# Altium PCB 2026.08.07.HMS.PD.BHHH.PcbDoc (part 1 of 2)
Units mm, origin at the board's own origin, x right, y up, seen from the top; angles counter-clockwise.
Board outline 110 x 110 mm, 2 copper layers (Top Layer, Bottom Layer); 168 components, 117 nets, 606 pads, 1355 vias.
Unrouted connection lines stored in the file: 4.
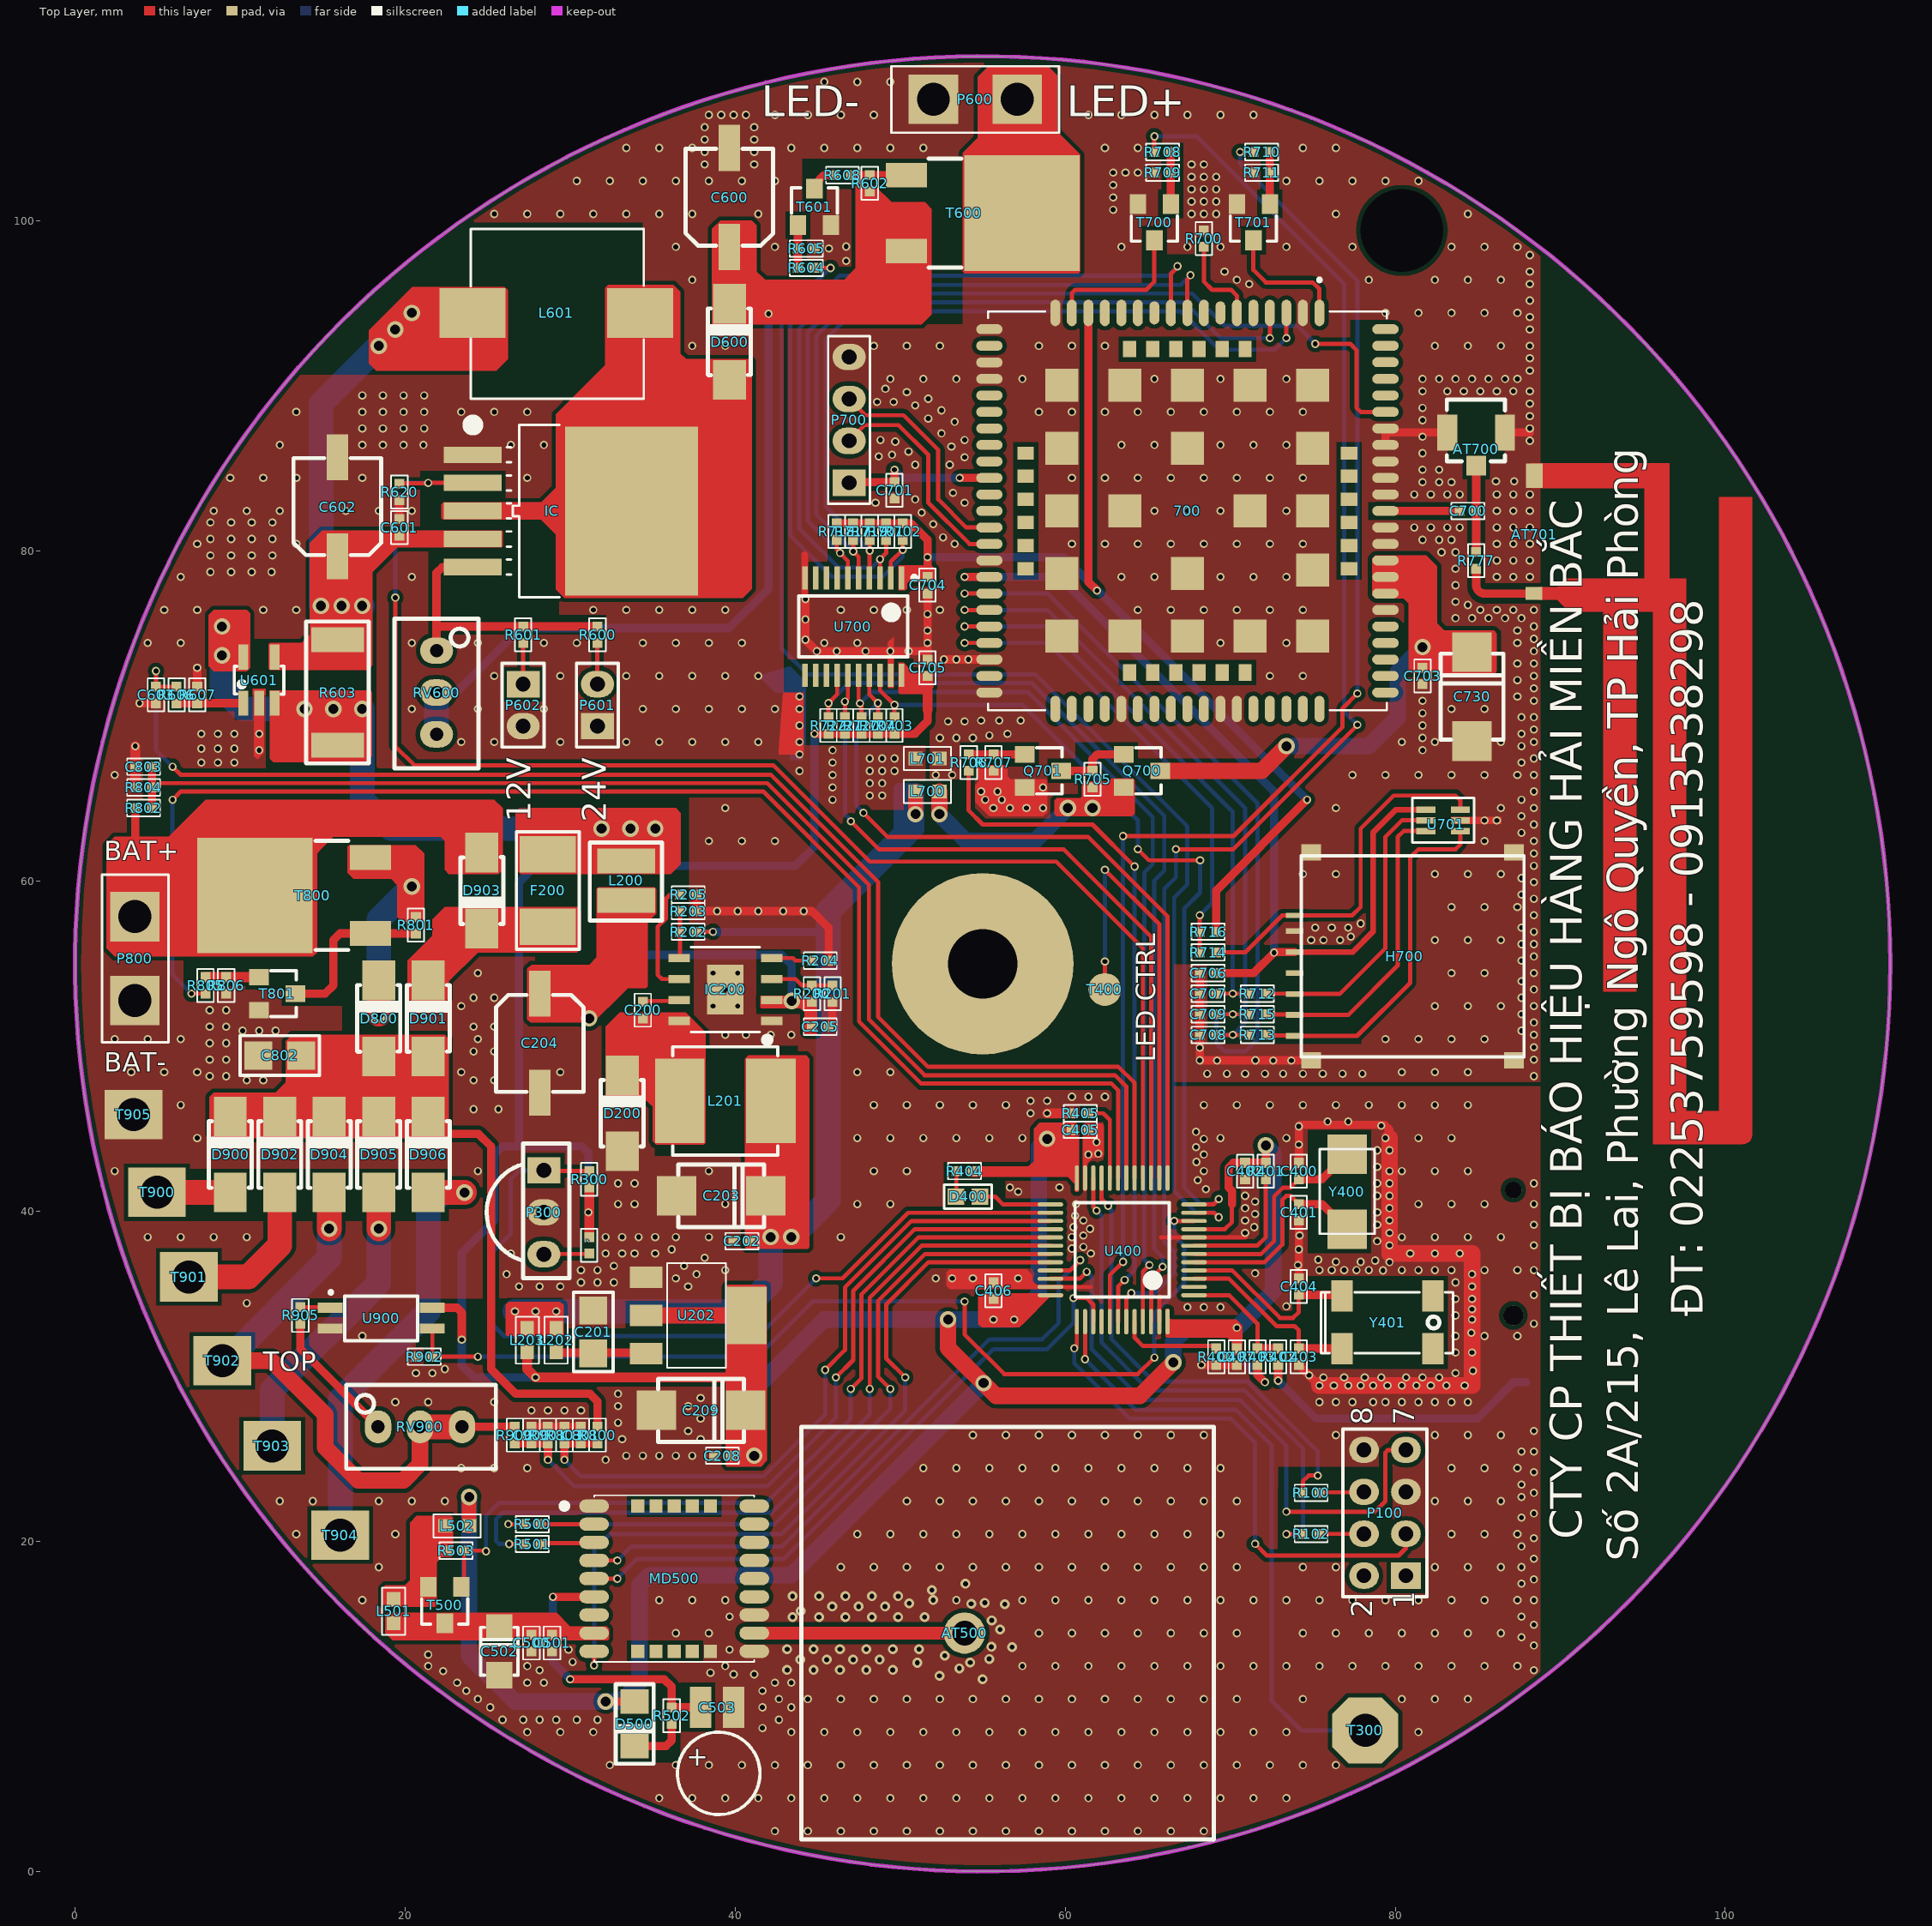
[diagram p0: Top Layer view]
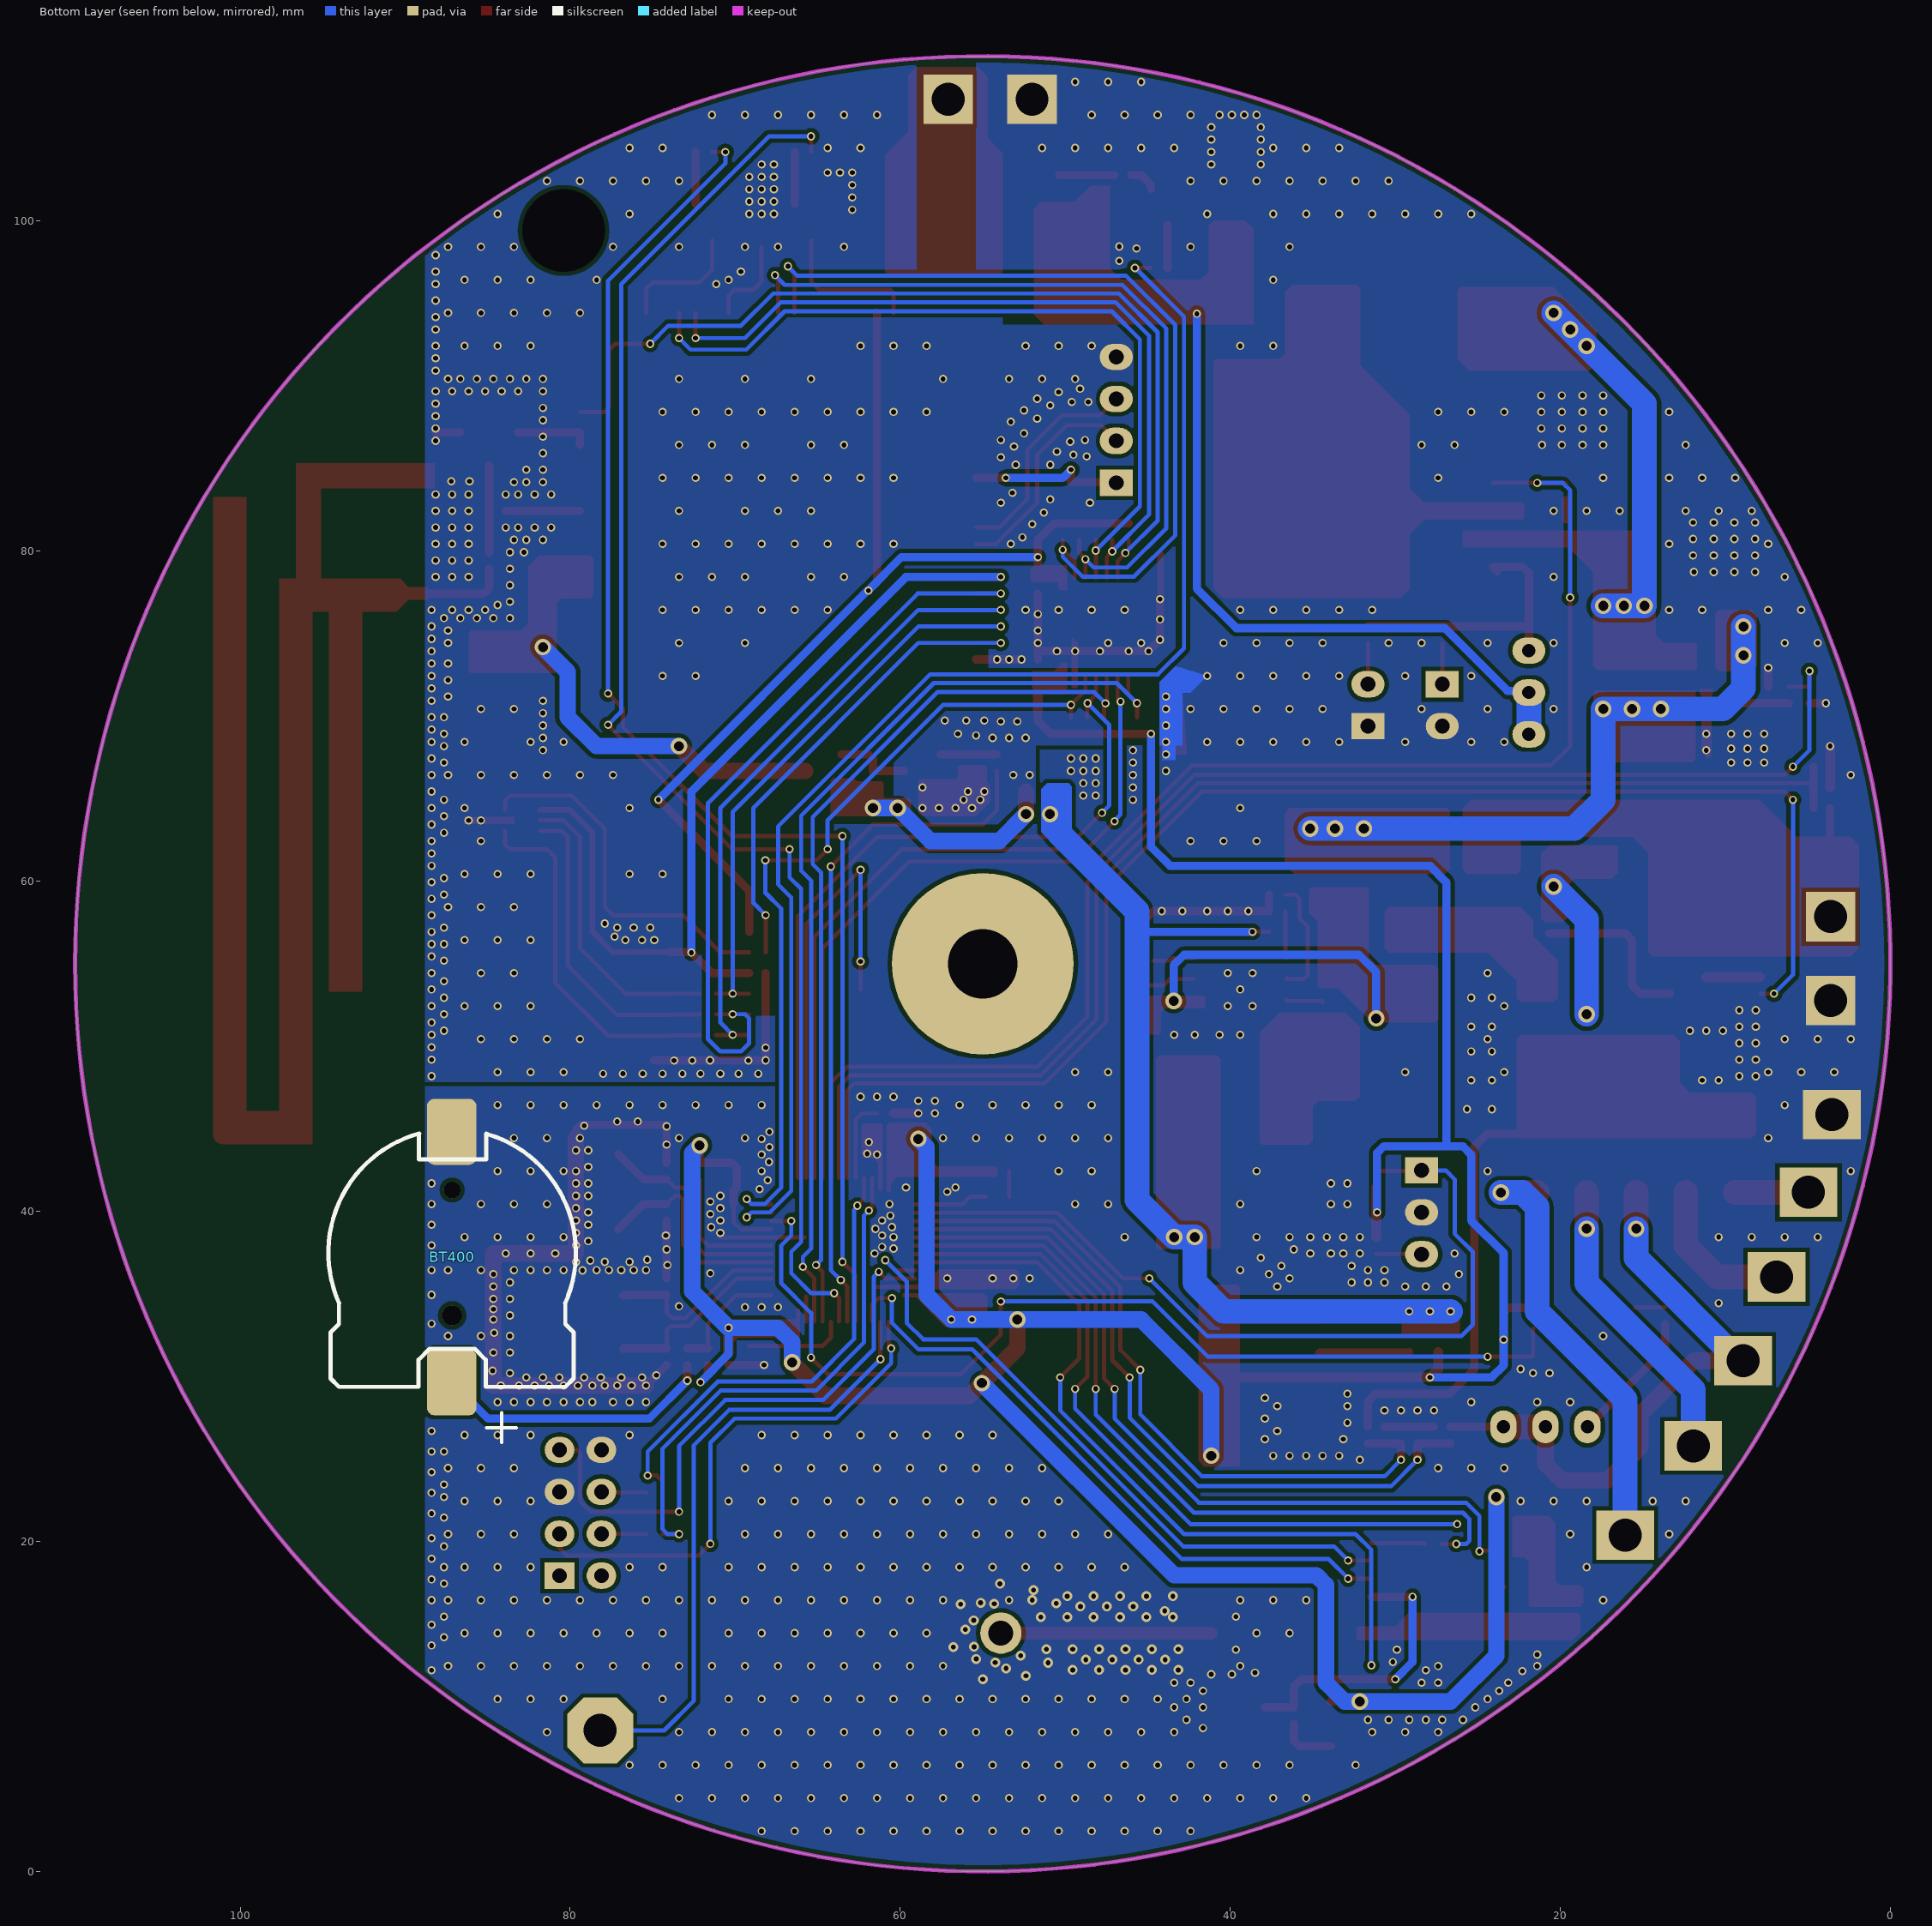
[diagram p1: Bottom Layer view, seen from below]
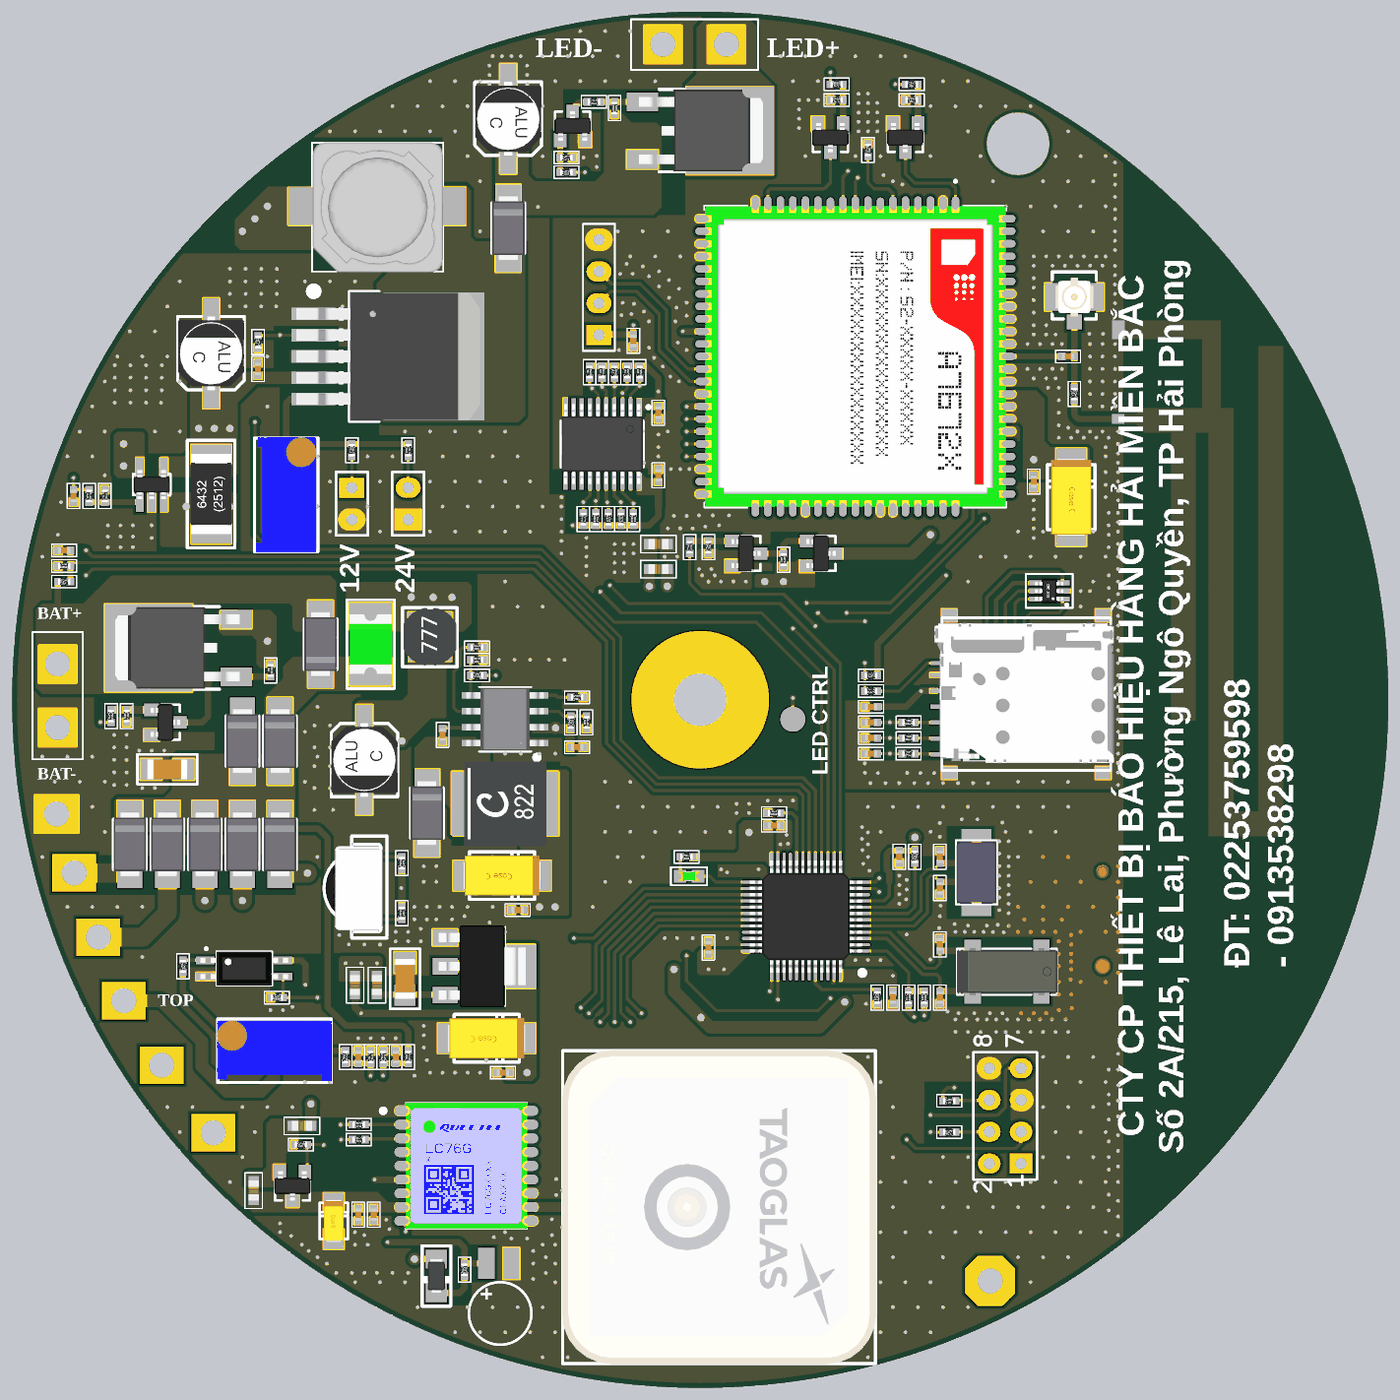
[diagram p3: 3D render of the assembled board from above, using the file's embedded part models]

## Layer stack, top to bottom
Top Solder: solder mask 0.0102, Solder Resist, Dk 3.5
Top Layer: signal copper 0.0356
Dielectric 1: dielectric 0.32, FR-4, Dk 4.8
Bottom Layer: signal copper 0.0356
Bottom Solder: solder mask 0.0102, Solder Resist, Dk 3.5

## Board outline
0,55 ccw(c55,55) 55,0 ccw(c55,55) 110,55 ccw(c55,55) 55,110 ccw(c55,55)

## Design rules (kind name [scope] priority, off if disabled: settings)
Clearance [not InComponent('U400','U701')] p1: gap=0.254
ComponentClearance [All] p1: gap=0 collisioncheckmode=3 verticalgap=0 showdistances=FALSE
HoleSize [All] p1: absolutevalues=TRUE maxlimit=25 minlimit=0.025 maxpercent=80.000 minpercent=20.000
PlaneConnect [All] p1: planeconnectstyle=Direct reliefexpansion=0.508 reliefentries=4 reliefconductorwidth=0.254 reliefairgap=0.254
PolygonConnect [All] p1: connectstyle=Direct reliefconductorwidth=0.254 reliefentries=4 polygonreliefangle="90 Angle" airgapwidth=0.254
RoutingVias [All] p1: holewidth=0.4 width=8 viastyle="Through Hole" minholewidth=0.3 minwidth=0.5 maxholewidth=0.6 maxwidth=1
SilkToSilkClearance [All] p1: silktosilkclearance=0
SilkToSolderMaskClearance [IsPad] p1: minsilkscreentomaskgap=0 clearancetoexposedcopper=TRUE
SolderMaskExpansion [All] p1: expansion=0.102
Width [All] p1: maxlimit=1.5 minlimit=0.254 preferedwidth=0.5
24 further rules are at their usual default settings.

## Classes and differential pairs
component class HMS.VS1838B: ` P300 R300 T300
component class HMS_Solar: C900 D900 D901 D902 D903 D904 D905 D906 R900 R901 R902 R905 RV900 T900 T901 T902 T903 T904 T905 U900
component class HMS_NiMHCharge: C801 C802 C803 D800 P800 R800 R801 R802 R803 R804 R805 R806 T800 T801
component class U_HMS.SIM.A7677S: 700 AT700 AT701 C700 C701 C703 C704 C705 C706 C707 C708 C709 C730 g H700 L700 L701 P700 Q700 Q701 R700 R701 R702 R703 R704 R705 R706 R707 R708 R709 R710 R711 R712 R713 R714 R715 R716 R717 R718 R719 R720 R721 R722 R777 T700 T701 U700 U701
component class HMS.STM32L151CBT6: BT400 C400 C401 C402 C403 C404 C405 C406 C407 D400 R400 R401 R402 R403 R404 R405 T400 U400 Y400 Y401
component class HMS.Power: C200 C201 C202 C203 C204 C205 C208 C209 D200 F200 IC200 L200 L201 L202 L203 R200 R201 R202 R203 R204 R205 U202
component class HMS.LedCtrl: C600 C601 C602 C603 D600 IC L601 P600 P601 P602 R600 R601 R602 R603 R604 R605 R606 R607 R608 R620 RV600 T600 T601 U601
component class U_HMS.LC76G: AT500 C500 C501 C502 C503 D500 L501 L502 MD500 R500 R501 R502 R503 T500
component class HMS.Bootloader: P100 R100 R102
net class 50Ohm: NetAT500_1

## Components (designator, comment, footprint, x,y, rotation, side; value= is the part's Value field where it differs from the comment)
700 "A767S2 S2-10AG4-Z31JP" SIM_A7672 75.404,94.443 r270 top
` "100R" RES_0402(1005) 31.154,37.943 r270 top
AT500 "GPS Antenna" "ANT GPS Passive" 53.904,14.443 r180 top
AT700 "NC" "IPEX SMD" 84.904,85.193 r270 top
AT701 "LTE Antenna" "Antenna LTE/4G PCB" 88.404,77.443 r0 top
BT400 "NC" "DE PIN NHO 3V3" 87.154,37.493 r270 bottom locked
C200 "104/50V" CAP_CERAMIC_0402(1005) 34.404,52.193 r90 top
C201 "106/50V" CAP_CERAMIC_1206(3216-18) 31.404,32.693 r270 top
C202 "104/50V" CAP_CERAMIC_0402(1005) 40.404,38.193 r0 top
C203 "107/10V" CAP_TANTAL_2312(6032-28) 39.154,40.943 r180 top
C204 "10uF/50V" CAP_ALUM_SMD_5054_TYPE_C 28.154,50.193 r90 top
C205 "104/50V" CAP_CERAMIC_0402(1005) 45.154,51.193 r180 top
C208 "104/50V" CAP_CERAMIC_0402(1005) 39.229,25.193 r0 top
C209 "107/10V" CAP_TANTAL_2312(6032-28) 37.929,27.943 r180 top
C400 "20pF/50V" CAP_CERAMIC_0402(1005) 74.154,42.443 r270 top
C401 "20pF/50V" CAP_CERAMIC_0402(1005) 74.154,39.943 r90 top
C402 "104/50V" CAP_CERAMIC_0402(1005) 70.904,42.443 r90 top
C403 "10pF/50V" CAP_CERAMIC_0402(1005) 74.154,31.193 r90 top
C404 "10pF/50V" CAP_CERAMIC_0402(1005) 74.154,35.443 r270 top
C405 "104/50V" CAP_CERAMIC_0402(1005) 60.904,44.943 r180 top
C406 "104/50V" CAP_CERAMIC_0402(1005) 55.654,35.193 r270 top
C407 "104/50V" CAP_CERAMIC_0402(1005) 70.404,31.193 r90 top
C500 "104/50V" CAP_CERAMIC_0402(1005) 27.654,13.843 r90 top
C501 "10pF/50V" CAP_CERAMIC_0402(1005) 28.904,13.843 r90 top
C502 "107/10V" CAP_TANTAL_1206(3216-18) 25.704,13.343 r270 top
C503 "NC" SPCAP0.22F 38.904,9.943 r180 top
C600 "10uF/50V" CAP_ALUM_SMD_5054_TYPE_C 39.654,101.443 r270 top
C601 "104/50V" CAP_CERAMIC_0402(1005) 19.654,81.443 r270 top
C602 "10uF/50V" CAP_ALUM_SMD_5054_TYPE_C 15.904,82.693 r270 top
C603 "104/50V" CAP_CERAMIC_0402(1005) 4.904,71.293 r90 top
C700 "100pF/50V" CAP_CERAMIC_0402(1005) 84.404,82.443 r180 top
C701 "104/50V" CAP_CERAMIC_0402(1005) 49.654,83.693 r270 top
C703 "104/50V" CAP_CERAMIC_0402(1005) 81.654,72.443 r90 top
C704 "104/50V" CAP_CERAMIC_0402(1005) 51.654,77.943 r90 top
C705 "104/50V" CAP_CERAMIC_0402(1005) 51.654,72.943 r270 top
C706 "104/50V" CAP_CERAMIC_0402(1005) 68.654,54.443 r0 top
C707 "20pF/50V" CAP_CERAMIC_0402(1005) 68.654,53.193 r0 top
C708 "20pF/50V" CAP_CERAMIC_0402(1005) 68.654,50.693 r0 top
C709 "20pF/50V" CAP_CERAMIC_0402(1005) 68.654,51.943 r0 top
C730 "107/10V" CAP_TANTAL_2312(6032-28) 84.654,71.193 r270 top
C801 "104/50V" CAP_CERAMIC_0402(1005) 30.654,26.443 r270 top
C802 "106/50V" CAP_CERAMIC_1206(3216-18) 12.404,49.443 r180 top
C803 "104/50V" CAP_CERAMIC_0402(1005) 4.154,66.943 r0 top
C900 "104/50V" CAP_CERAMIC_0402(1005) 27.654,26.443 r270 top
D200 "SS34" DO214AC_SMA_1808 33.154,45.943 r90 top
D400 "LED Red" LED_0603_GREEN 54.104,40.893 r0 top
D500 "1N4148W" DIODE_F03_1005 33.904,8.943 r270 top
D600 "SS54" DO214AC_SMA_1808 39.654,92.693 r90 top
D800 "SS34" DO214AC_SMA_1808 18.404,51.693 r90 top
D900 "SS34" DO214AC_SMA_1808 9.404,43.443 r90 top
D901 "SS34" DO214AC_SMA_1808 21.404,51.693 r90 top
D902 "SS34" DO214AC_SMA_1808 12.404,43.443 r90 top
D903 "SS34" DO214AC_SMA_1808 24.654,59.443 r270 top
D904 "SS34" DO214AC_SMA_1808 15.404,43.443 r90 top
D905 "SS34" DO214AC_SMA_1808 18.404,43.443 r90 top
D906 "SS34" DO214AC_SMA_1808 21.404,43.443 r90 top
F200 "1A/33V" MF-MSMF 28.654,59.443 r90 top
H700 "MUP-C7801-2" MUP-C7801 74.304,49.353 r90 top
IC "XL6019E1" TO-263-5 28.904,82.443 r270 top
IC200 "RY81020CP8" MK9019 39.404,53.443 r180 top
L200 "3.3uH" L2.1A_3.5_3.3 33.404,60.043 r180 top
L201 "10uH" L3A_7x7x3mm 39.404,46.693 r0 top
L202 "FBMJ1608HM230NT" Inductor_0603 29.154,32.193 r270 top
L203 "FBMJ1608HM230NT" Inductor_0603 27.404,32.193 r270 top
L501 "4A/23Ohm" Inductor_0603 19.304,15.766 r270 top
L502 "NC" Inductor_0603 23.154,20.943 r180 top
L601 "33uH" L3A_10x10x4mm 29.154,94.443 r0 top
L700 "FBMJ1608HM230NT" Inductor_0603 51.654,65.443 r0 top
L701 "FBMJ1608HM230NT" Inductor_0603 51.654,67.443 r0 top
MD500 "SIM65M-C" LC76G_GPS 31.454,22.143 r0 top
P100 "NC" HDR2X4 80.644,17.923 r90 top
P300 "VS1838B" IR_RECEIVER 28.404,39.943 r270 top
P600 "NC" H2_BIG 54.554,107.393 r180 top
P601 "24V" HDR1X2 31.654,70.673 r90 top
P602 "12V" HDR1X2 27.154,70.673 r270 top
P700 "NC" HDR1X4 46.904,87.963 r90 top
P800 "NC" H2_BIG 3.629,55.318 r270 top
Q700 "AO3415" SOT23-3 64.654,66.693 r270 top
Q701 "C1815" SOT23-3 58.654,66.693 r270 top
R100 "1K" RES_0402(1005) 74.904,22.943 r180 top
R102 "1K" RES_0402(1005) 74.904,20.443 r180 top
R200 "68K" RES_0402(1005) 44.654,53.193 r270 top
R201 "20K" RES_0402(1005) 45.904,53.193 r90 top
R202 "20K" RES_0402(1005) 37.154,56.943 r0 top
R203 "5.1K" RES_0402(1005) 37.154,58.193 r180 top
R204 "20K" RES_0402(1005) 45.154,55.193 r180 top
R205 "NC" RES_0402(1005) 37.154,59.193 r180 top
R300 "10K" RES_0402(1005) 31.154,41.943 r270 top
R400 "100K" RES_0402(1005) 69.154,31.193 r90 top
R401 "100K" RES_0402(1005) 72.154,42.443 r90 top
R402 "NC" RES_0402(1005) 72.904,31.193 r90 top
R403 "0R" RES_0402(1005) 71.654,31.193 r90 top
R404 "1K" RES_0402(1005) 53.904,42.443 r180 top
R405 "100K" RES_0402(1005) 60.904,45.943 r0 top
R500 "1K" RES_0402(1005) 27.704,21.043 r180 top
R501 "1K" RES_0402(1005) 27.704,19.843 r180 top
R502 "100R" RES_0402(1005) 36.154,9.443 r270 top
R503 "10K" RES_0402(1005) 23.079,19.443 r180 top
R600 "5.1K" RES_0402(1005) 31.654,74.943 r90 top
R601 "10K" RES_0402(1005) 27.154,74.943 r90 top
R602 "10K" RES_0402(1005) 48.154,102.293 r270 top
R603 "0.1R" RES_2512 15.904,71.443 r90 top
R604 "1K" RES_0402(1005) 44.304,97.168 r180 top
R605 "10K" RES_0402(1005) 44.304,98.343 r180 top
R606 "330R" RES_0402(1005) 6.154,71.293 r90 top
R607 "100K" RES_0402(1005) 7.404,71.293 r270 top
R608 "10K" RES_0402(1005) 46.504,102.793 r180 top
R620 "100K" RES_0402(1005) 19.654,83.593 r90 top
R700 "NC" RES_0402(1005) 68.404,98.943 r270 top
R701 "2K2" RES_0402(1005) 49.154,81.193 r90 top
R702 "2K2" RES_0402(1005) 50.154,81.193 r90 top
R703 "2K2" RES_0402(1005) 49.654,69.443 r270 top
R704 "2K2" RES_0402(1005) 48.654,69.443 r270 top
R705 "10K" RES_0402(1005) 61.654,66.193 r90 top
R706 "1K" RES_0402(1005) 54.154,67.193 r270 top
R707 "10K" RES_0402(1005) 55.654,67.193 r270 top
R708 "1K" RES_0402(1005) 65.904,104.193 r180 top
R709 "4.7K" RES_0402(1005) 65.904,102.943 r180 top
R710 "1K" RES_0402(1005) 71.904,104.193 r180 top
R711 "4.7K" RES_0402(1005) 71.904,102.943 r180 top
R712 "0R" RES_0402(1005) 71.654,53.193 r0 top
R713 "0R" RES_0402(1005) 71.654,50.693 r0 top
R714 "0R" RES_0402(1005) 68.654,55.693 r0 top
R715 "0R" RES_0402(1005) 71.654,51.943 r0 top
R716 "4.7K" RES_0402(1005) 68.654,56.943 r0 top
R717 "2K2" RES_0402(1005) 47.154,81.193 r90 top
R718 "2K2" RES_0402(1005) 46.154,81.193 r90 top
R719 "2K2" RES_0402(1005) 48.154,81.193 r90 top
R720 "2K2" RES_0402(1005) 47.654,69.443 r270 top
R721 "2K2" RES_0402(1005) 46.654,69.443 r270 top
R722 "2K2" RES_0402(1005) 45.654,69.443 r270 top
R777 "NC" RES_0402(1005) 84.904,79.443 r90 top
R800 "100K" RES_0402(1005) 31.654,26.443 r90 top
R801 "10K" RES_0402(1005) 20.654,57.343 r90 top
R802 "100K" RES_0402(1005) 4.154,64.443 r180 top
R803 "10K" RES_0402(1005) 29.654,26.443 r270 top
R804 "10K" RES_0402(1005) 4.154,65.693 r0 top
R805 "1K" RES_0402(1005) 7.904,53.693 r90 top
R806 "10K" RES_0402(1005) 9.154,53.693 r90 top
R900 "100K" RES_0402(1005) 26.654,26.443 r90 top
R901 "10K" RES_0402(1005) 28.654,26.443 r270 top
R902 "10K" RES_0402(1005) 21.154,31.193 r0 top
R905 "10K" RES_0402(1005) 13.654,33.693 r270 top
RV600 "204" RES_VAR_Type1 21.904,71.443 r270 top
RV900 "104" RES_VAR_Type1 20.904,26.943 r0 top
T300 "Test Point" TP 78.179,8.543 r0 top
T400 "Test Point" "Test Point SMD" 62.404,53.443 r90 top
T500 "AO3415" SOT23-3 22.404,16.143 r180 top
T600 "AOD409" TO252 55.904,100.493 r270 top
T601 "C1815" SOT23-3 44.804,100.868 r0 top
T700 "C1815" SOT23-3 65.404,99.943 r180 top
T701 "2SC1815" SOT23-3 71.404,99.943 r180 top
T800 "AOD409" TO252 12.372,59.143 r90 top
T801 "C1815" SOT23-3 12.254,53.193 r270 top
T900 "Test Point" TP_2 4.962,41.157 r180 top
T901 "Test Point" TP_2 6.892,36.026 r180 top
T902 "Test Point" TP_2 8.924,30.946 r180 top
T903 "Test Point" TP_2 11.947,25.79 r180 top
T904 "Test Point" TP_2 16.074,20.38 r180 top
T905 "Test Point" TP_2 3.554,45.868 r180 top
U202 "TLV1117LV33DCYR" LM1117-SOP 37.654,33.693 r270 top
U400 "STM32L151CBT6" LQFP48_L 63.454,37.668 r180 top locked
U601 "INA138NA/3K" SOT23-5 11.154,72.193 r0 top
U700 "TC7MPB9307FT(EL)" TSOP65P640X120-20N 47.154,75.443 r270 top
U701 "SMF05CT2G" SOT65P210X140-6N 82.904,63.693 r180 top
U900 "EL3H7(C)(TA)-G" "Opto small" 18.904,33.693 r0 top
Y400 "8Mhz" CRYSTAL_SMD_2PIN-5032 77.079,41.193 r90 top
Y401 "32.768KHz" ABS25-32768-6-T 79.529,33.268 r0 top

## Footprints (in the part's own frame and the unit in brackets; to place one, negate y for a bottom-side part, rotate by r counter-clockwise, add the part's x,y. Pads: shape width x height; smd on the part's side, far side on the other; paste and mask are expansions set on the pad)
ABS25-32768-6-T [mm] "CRYSTAL 32.768KHZ 6PF SMD"
  rect 1.3x1.9 smd: 1(-2.75,-1.6) 2(2.75,-1.6) 3(2.75,1.6) 4(-2.75,1.6)
  silkscreen extent -4.02,-1.85 3.98,1.83, body extent -4,-1.9 4,1.9, height 2.53
"ANT GPS Passive" [mm]
  round 2.5 hole 1.5: 1(0,0)
  silkscreen extent -15.1,-12.5 9.9,12.5, body extent -15.15,-12.55 9.95,12.55, height 4.73
"Antenna LTE/4G PCB" [mm]
  rect 1x0.77 smd paste+0 mask+0: 1(0,0)
  rect 1x1.5 smd paste+0 mask+0: 2(0.026,7.138)
  Top Layer region: 0.254,-0.38 1.397,-0.38 2.131,-1.114 4.216,-1.114 4.216,-24.126 6.215,-24.126 6.215,-1.114 7.216,-1.114 7.216,-33.362 12.67,-33.362 12.879,-33.32 13.056,-33.202 13.174,-33.025 13.216,-32.816 13.216,-32.816 13.216,5.843 11.214,5.843 11.214,-31.36 9.215,-31.36 9.215,0.888 8.217,0.888 8.217,7.885 -0.178,7.885 -0.178,6.387 6.713,6.387 6.713,0.888 1.902,0.888 1.4,0.385 0.257,0.385 0,0.128 0,-0.128
CAP_ALUM_SMD_5054_TYPE_C [mm]
  rect 2.8x1.3 smd: 1(3,0) 2(-3,0)
  silkscreen extent -2.95,-2.67 2.92,2.65, body extent -2.95,-2.65 2.95,2.65, height 5.41
CAP_CERAMIC_0402(1005) [mm] "Chip Inductor, Body 1.0x0.5mm, IPC High Density"
  rect 0.6x0.6 smd: 1(-0.5,0) 2(0.5,0)
  silkscreen extent -1,-0.5 1,0.5, body extent -0.5,-0.25 0.5,0.25, height 0.5
CAP_CERAMIC_1206(3216-18) [mm] "Chip Capacitor, Body 3.2x1.6mm, IPC High Density"
  rect 1.7x1.7 smd: 1(-1.3,0) 2(1.3,0)
  silkscreen extent -2.4,-1.2 2.4,1.2, body extent -1.6,-0.8 1.6,0.8, height 1
CAP_TANTAL_1206(3216-18) [mm] "Chip Capacitor, Body 3.2x1.6mm, IPC High Density"
  rect 1.6x1.6 smd: 1(-1.45,0) 2(1.45,0)
  silkscreen extent -1.45,-1.12 1.45,1.12, body extent -1.7,-0.8 1.7,0.8, height 1.65
CAP_TANTAL_2312(6032-28) [mm] "Chip Resistor, Body 6.0x3.2mm, IPC High Density"
  rect 2.4x2.4 smd: 1(-2.7,0) 2(2.7,0)
  silkscreen extent -2.6,-1.91 2.6,1.91, body extent -3.09,-1.6 3.09,1.6, height 2.69
CRYSTAL_SMD_2PIN-5032 [mm] "Crystal smd"
  rect 2.4x2.4 smd mask+0.025: 1(-2.275,0) 2(2.275,0)
  silkscreen extent -2.55,-1.67 2.58,1.65, body extent -2.5,-1.6 2.5,1.6, height 1.3
"DE PIN NHO 3V3" [mm]
  rrect30% 4x3 smd mask+0.051: 1(7.85,-0.025) 2(-7.325,-0.025)
  round 1 hole 1 unplated paste+0 mask+0: ""(-3.8,0)
  round 1.2 hole 1.2 unplated mask+0: ""(3.8,0)
  silkscreen extent -7.23,-7.5 11.5,7.5, body extent -9,-7.5 9.5,7.49, height 3.92
DIODE_F03_1005 [mm]
  rect 1.5x1.7 smd: 1(-1.35,0) 2(1.35,0)
  silkscreen extent -2.4,-1.14 2.41,1.16, body extent -1.35,-0.7 1.35,0.7, height 0.73
DO214AC_SMA_1808 [mm] "Diode B340, Diode M7"
  rect 2.4x2 smd: 1(-2.3,0) 2(2.3,0)
  silkscreen extent -2.02,-1.3 2.02,1.3, body extent -2.6,-1.3 2.6,1.3, height 2.42
H2_BIG [mm] "Euro Block"
  rect 3x3 hole 2: 1(-2.54,0) 2(2.54,0)
  silkscreen extent -5.08,-2 5.08,2.03, body extent -3.81,-1.27 3.81,1.27, height 1.5
HDR1X2 [mm] "Connector; Header; 2 Position"
  rect 1.6x2 hole 0.9: 1(-1.27,0)
  oval 1.6x2 hole 0.9: 2(1.27,0)
  silkscreen extent -2.54,-1.27 2.54,1.27, body extent -2.54,-1.27 2.54,1.27, height 7
HDR1X4 [mm] "Connector; Header; 4 Position"
  rect 1.6x2 hole 0.9: 1(-3.81,0)
  oval 1.6x2 hole 0.9: 2(-1.27,0) 3(1.27,0) 4(3.81,0)
  silkscreen extent -5.08,-1.27 5.08,1.27, body extent -5.08,-1.27 5.08,1.27, height 7
HDR2X4 [mm] "Connector; Header; 4x2 Position"
  rect 1.6x1.8 hole 0.9: 1(0,0)
  oval 1.6x1.8 hole 0.9: 2(0,2.54) 3(2.54,0) 4(2.54,2.54) 5(5.08,0) 6(5.08,2.54) 7(7.62,0) 8(7.62,2.54)
  silkscreen extent -1.27,-1.27 8.89,3.81, body extent -1.27,-1.27 8.89,3.81, height 7
Inductor_0603 [mil] "HK1608R22J-T"
  rect 34x32 smd paste+0 mask+0: 1(-28.54,0) 2(28.46,0)
  silkscreen extent -56,-28 56,28, body extent -32,-16 31,16, height 37
"IPEX SMD" [mm] "IPEX Connector SMD"
  rect 1.2x1.2 smd: 1(0,0)
  rect 2.2x1.2 smd: 2(-2,1.75) 2(-2,-1.75)
  silkscreen extent -4,-1.78 -0.25,1.75, body extent -3.55,-1.5 -0.45,1.5, height 1.25
IR_RECEIVER [mm] "TO, Flat Index; 3 In-Line, Axial Leads; Body Dia. 4.8mm; Leads 0.55 x 0.51 mm (max)"
  rect 1.6x2 hole 0.9: 1(-2.54,0)
  oval 1.6x2 hole 0.9: 2(0,0) 3(2.54,0)
  silkscreen extent -4.17,-3.46 3.99,1.55, body extent -3.62,-3.6 3.62,1.2, height 8.8
L2.1A_3.5_3.3 [mm]
  rect 3.5x1.5 smd: 1(0,-1.2) 2(0,1.2)
  silkscreen extent -2.16,-2.31 2.21,2.41, body extent -2.1,-2.31 2.1,2.31, height 3.47
L3A_7x7x3mm [mm]
  rect 3x5.12 smd: 1(-2.764,0) 2(2.764,0)
  silkscreen extent -3.18,-3.28 3.18,3.28, body extent -3.28,-3.38 3.28,3.38, height 6.1
L3A_10x10x4mm [mm]
  rect 4x3 smd: 1(-5.08,0) 2(5.08,0)
  silkscreen extent -5.18,-5.21 5.31,5.08, body extent -5.12,-5.28 5.28,5.12, height 6.25
LC76G_GPS [mm] "Modlue GNSS"
  rrect100% 1.8x0.8 smd mask+0.05: 1(0,0) 2(0,-1.1) 3(0,-2.2) 4(0,-3.3) 5(0,-4.4) 6(0,-5.5) 7(0,-6.6) 8(0,-7.7) 9(0,-8.8) 10(9.7,-8.8) 11(9.7,-7.7) 12(9.7,-6.6) 13(9.7,-5.5) 14(9.7,-4.4) 15(9.7,-3.3) 16(9.7,-2.2) 17(9.7,-1.1) 18(9.7,0)
  rect 0.8x0.8 smd mask+0.05: 19(7.05,0) 20(5.95,0) 21(4.85,0) 22(3.75,0) 23(2.65,0) 24(2.65,-8.8) 25(3.75,-8.8) 26(4.85,-8.8) 27(5.95,-8.8) 28(7.05,-8.8)
  silkscreen extent -1.9,-9.45 9.7,0.65, body extent 0,-9.45 9.7,0.65, height 2.4
LED_0603_GREEN [mm] "Chip Capacitor, Body 1.6x0.8mm, IPC High Density"
  rect 1x1 smd: 1(-0.725,0) 2(0.725,0)
  silkscreen extent -1.45,-0.73 1.45,0.72, body extent -0.8,-0.4 0.8,0.4, height 0.6
LM1117-SOP [mm]
  rect 1.3x2 smd: 1(-2.3,-3.048) 2(0,-3.048) 3(2.3,-3.048)
  rect 3.5x2.4 smd: 2(0,3.048)
  silkscreen extent -3.18,-1.78 3.18,1.78, body extent -3.25,-3.56 3.25,3.4, height 1.68
LQFP48_L [mm] "Thin QFP, 48-Leads, Body 7x7mm, Pitch 0.5mm, IPC High Density"
  round 0.8 on Top Overlay: 0(-4.5,4.5)
  oval 1.55x0.25 smd: 1(-4.35,2.75) 2(-4.35,2.25) 3(-4.35,1.75) 4(-4.35,1.25) 5(-4.35,0.75) 6(-4.35,0.25) 7(-4.35,-0.25) 8(-4.35,-0.75) 9(-4.35,-1.25) 10(-4.35,-1.75) 11(-4.35,-2.25) 12(-4.35,-2.75) 25(4.35,-2.75) 26(4.35,-2.25) 27(4.35,-1.75) 28(4.35,-1.25) 29(4.35,-0.75) 30(4.35,-0.25) 31(4.35,0.25) 32(4.35,0.75) 33(4.35,1.25) 34(4.35,1.75) 35(4.35,2.25) 36(4.35,2.75)
  oval 0.25x1.55 smd: 13(-2.75,-4.35) 14(-2.25,-4.35) 15(-1.75,-4.35) 16(-1.25,-4.35) 17(-0.75,-4.35) 18(-0.25,-4.35) 19(0.25,-4.35) 20(0.75,-4.35) 21(1.25,-4.35) 22(1.75,-4.35) 23(2.25,-4.35) 24(2.75,-4.35) 37(2.75,4.35) 38(2.25,4.35) 39(1.75,4.35) 40(1.25,4.35) 41(0.75,4.35) 42(0.25,4.35) 43(-0.25,4.35) 44(-0.75,4.35) 45(-1.25,4.35) 46(-1.75,4.35) 47(-2.25,4.35) 48(-2.75,4.35)
  silkscreen extent -2.85,-2.85 2.85,2.85, body extent -4.5,-4.5 4.5,4.5, height 1.6
MF-MSMF [mm]
  rect 2.2x3.4 smd: 1(-2.2,0) 2(2.2,0)
  silkscreen extent -3.56,-1.91 3.56,1.91, body extent -2.36,-1.74 2.37,1.74, height 1.03
MK9019 [mm]
  rect 1.3x0.508 smd paste+0 mask+0: 1(-2.803,1.905) 2(-2.803,0.635) 3(-2.803,-0.635) 4(-2.803,-1.905) 5(2.803,-1.905) 6(2.803,-0.635) 7(2.803,0.635) 8(2.803,1.905)
  rect 2.2x3 smd paste+0 mask+0: EPAD(0,0)
  silkscreen extent -2.67,-2.58 2.08,3.17, body extent -3.1,-2.45 3.1,2.45, height 1.76
MUP-C7801 [mm] "Push-Push NANO-SIM Card"
  rect 0.35x1.04 smd: 1(6.36,0.4) 2(3.82,0.4) 3(1.28,0.4) 5(7.63,0.4) 6(5.09,0.4) 7(2.55,0.4)
  rect 1x1.2 smd: 5(-0.2,-0.6) 5(-0.2,-12.9) 5(12.4,-0.6) 5(12.4,-12.9)
  rect 0.3x1.04 smd: 8(8.58,0.4)
  silkscreen extent 0,-13.5 12.2,0, body extent 0.57,-13.75 11.79,0.6, height 1.25
"Opto small" [mm]
  rect 1.5x0.6 smd: 1(-3.454,0.468) 2(-3.454,-0.802) 3(2.746,-0.802) 4(2.746,0.468)
  silkscreen extent -3.5,-1.53 1.85,1.5, body extent -3.85,-1.53 3.15,1.17, height 2.01
RES_0402(1005) [mm] "Chip Inductor, Body 1.0x0.5mm, IPC High Density"
  rect 0.6x0.6 smd: 1(-0.5,0) 2(0.5,0)
  silkscreen extent -1,-0.5 1,0.5, body extent -0.5,-0.25 0.5,0.25, height 0.35
RES_2512 [mm]
  rect 1.5x3.2 smd: 1(-3.2,0) 2(3.2,0)
  silkscreen extent -4.3,-1.9 4.3,1.9, body extent -3.2,-1.6 3.2,1.6, height 0.6
RES_VAR_Type1 [mm] "Bien tro vi chinh"
  oval 1.6x2 hole 0.8: 1(-2.54,0) 2(0,0) 3(2.54,0)
  silkscreen extent -4.47,-2.54 4.6,2.54, body extent -4.54,-2.4 4.66,2.4, height 12.02
SIM_A7672 [mm]
  oval 1.6x0.6 smd: 1(0,0) 2(0,-1) 3(0,-2) 4(0,-3) 5(0,-4) 6(0,-5) 8(0,-7) 9(0,-8) 10(0,-9) 12(0,-11) 13(0,-12) 14(0,-13) 15(0,-14) 16(0,-15) 17(0,-16) 35(24,-16) 36(24,-15) 37(24,-14) 38(24,-13) 39(24,-12) 40(24,-11) 41(24,-10) 42(24,-9) 43(24,-8) 44(24,-7) 45(24,-6) 46(24,-5) 47(24,-4) 48(24,-3) 49(24,-2) 50(24,-1) 51(24,0)
  oval 1.4x0.6 smd: 7(0,-6) 11(0,-10)
  oval 0.6x1.6 smd: 18(4,-20) 19(5,-20) 20(6,-20) 21(7,-20) 22(8,-20) 23(9,-20) 24(10,-20) 25(11,-20) 26(12,-20) 27(13,-20) 28(14,-20) 29(15,-20) 30(16,-20) 31(17,-20) 32(18,-20) 33(19,-20) 34(20,-20) 52(20,4) 53(19,4) 54(18,4) 55(17,4) 56(16,4) 57(15,4) 58(14,4) 59(13,4) 60(12,4) 61(11,4) 62(10,4) 63(9,4) 64(8,4) 65(7,4) 66(6,4) 67(5,4) 68(4,4) 89(0.99,-20) 90(1.99,-20) 91(3,-20) 92(21,-20) 93(22,-20) 94(23,-20) 95(23,4) 96(22,4) 97(21,4) 98(2.99,4) 99(1.99,4) 100(0.99,4)
  rect 2x2 smd: 69(4.389,-0.4) 70(4.389,-4.2) 71(4.389,-8) 72(4.389,-11.8) 73(4.389,-15.6) 74(8.189,-15.6) 75(11.989,-15.6) 76(15.789,-15.6) 77(19.589,-15.6) 78(19.589,-11.8) 79(19.589,-8) 80(19.589,-4.2) 81(19.589,-0.4) 82(15.589,-0.4) 83(11.989,-0.4) 84(8.189,-0.4) 85(8.189,-8) 86(11.989,-11.8) 87(15.789,-8) 88(11.989,-4.2)
  rect 1x0.8 smd: 101(2.19,-4.5) 102(2.19,-5.9) 103(2.19,-7.3) 104(2.19,-8.7) 105(2.19,-10.1) 106(2.19,-11.5) 113(21.79,-11.5) 114(21.79,-10.1) 115(21.79,-8.7) 116(21.79,-7.3) 117(21.79,-5.9) 118(21.79,-4.5)
  rect 0.8x1 smd: 107(8.5,-17.8) 108(9.9,-17.8) 109(11.3,-17.8) 110(12.7,-17.8) 111(14.1,-17.8) 112(15.5,-17.8) 119(15.5,1.8) 120(14.1,1.8) 121(12.7,1.8) 122(11.3,1.8) 123(9.9,1.8) 124(8.5,1.8)
  silkscreen extent -2.1,-20.07 24.07,4.08, body extent 0,-20 24,4, height 3.02
SOT23-3 [mm]
  round 0.5 on Top Overlay: 1(-1.016,0)
  rect 1x1.2 smd: 1(-1,-1.1) 2(1,-1.1) 3(0,1.1)
  silkscreen extent -1.4,-0.38 1.4,1.15, body extent -1.46,-1.17 1.46,1.17, height 1
SOT23-5 [mm]
  rect 0.6x1.524 smd: 1(-0.95,-1.4) 2(0,-1.4) 3(0.95,-1.4) 4(0.95,1.4) 5(-0.95,1.4)
  silkscreen extent -1.5,-0.85 1.5,0.85, body extent -1.46,-1.17 1.46,1.17, height 1
SOT65P210X140-6N [mm] "SOT23, 6-Leads, Body 2.00x2.10mm, Pitch 0.65mm, IPC Medium Density"
  round 0.4 on Top Overlay: 0(-1.4,1.1)
  rect 1.15x0.4 smd: 1(-1.05,0.65) 2(-1.05,0) 3(-1.05,-0.65) 4(1.05,-0.65) 5(1.05,0) 6(1.05,0.65)
  silkscreen extent -1.88,-1.35 1.88,1.35, body extent -1.13,-1 1.13,1, height 1
SPCAP0.22F [mm]
  rect 1.3x2.5 smd: 1(1,0) 2(-1,0)
  silkscreen extent -2.6,1.5 2.4,6.5
"Test Point SMD" [mm]
  round 2 smd: 1(0,0)
TO252 [mm]
  rect 1.5x2.5 smd: 1(-2.3,-5.532) 3(2.3,-5.532)
  rect 7x7 smd: 2(0,1.468)
  silkscreen extent -3.3,-4.19 3.3,-2.2, body extent -3.27,-5.81 3.27,4.13, height 2.41
TO-263-5 [mm]
  rect 1x3.5 smd paste+0 mask+0: 1(-3.4,-4.815) 2(-1.7,-4.815) 3(0,-4.815) 4(1.7,-4.815) 5(3.4,-4.815)
  rect 10.236x8.071 smd paste+0 mask+0: 6(0,4.815)
  silkscreen extent -5.33,-4.93 5.22,0.46, body extent -5.09,-6.19 5.09,8.49, height 4.68
TP [mm] "TestPoint"
  oct 4x4 hole 2: 1(0,0)
TP_2 [mm] "TestPoint"
  rect 3.5x3 hole 2: 1(0,0)
TSOP65P640X120-20N [mm] "TSOP, 20-Leads, Body 6.50x4.40mm, Pitch 0.65mm, IPC Medium Density"
  rect 1.4x0.35 smd: 1(-2.95,2.925) 2(-2.95,2.275) 3(-2.95,1.625) 4(-2.95,0.975) 5(-2.95,0.325) 6(-2.95,-0.325) 7(-2.95,-0.975) 8(-2.95,-1.625) 9(-2.95,-2.275) 10(-2.95,-2.925) 11(2.95,-2.925) 12(2.95,-2.275) 13(2.95,-1.625) 14(2.95,-0.975) 15(2.95,-0.325) 16(2.95,0.325) 17(2.95,0.975) 18(2.95,1.625) 19(2.95,2.275) 20(2.95,2.925)
  silkscreen extent -3.07,-3.3 1.85,3.83, body extent -3.2,-3.25 3.2,3.25, height 1

## Part data
700: library part SIM_A7672
` R502: library part Res1, "RES 100 OHM 1% 1/8W 0402"
AT500: library part "Antenna GPS Passive", "SWG018-35, Passive antenna 25x25x4mm, pin length 3.5mm, Three-proof varnish"
AT700: library part IPEX-AT, "IPEX SMD"
AT701: library part "Antenna GSM/LTE PCB"
BT400: library part Battery
C200 C202 C500 C501 C603 C801 C803 C900: library part "Cap Cer 0603 (1608)", "CAP CER 0.1UF 50V X5R 0402"
C201: library part CL31A106KOHNNNE, "CAP Ceramic 106/50V 10% 1206"
C203 C730: library part "Cap Tantal 2312 (6032-28)", "Capacitor Tantalum 100uF/10V 2312(6032-28)"
C204: library part UWT1C221MCL1GS, "Capacitor Alum 10uF/50V SMD 5x5.4mm"
C205 C208 C704 C705: library part Cap, "CAP CER 0.1UF 50V X5R 0402"
C209: library part UWT1C221MCL1GS, "Cap Tantal 10uF/6.3V 10% 1206"
C400 C401: library part "Cap Cer 0603 (1608)", "CAP CER 20PF 50V C0G/NP0 0402"
C402 C405 C406 C407: library part C0603C104K5RACTU, "CAP CER 0.1UF 50V X5R 0402"
C403: library part "Cap Cer 0603 (1608)", "CAP CER 10PF 50V C0G/NP0 0402"
C404: library part "Cap Cer 0603 (1608)", "Capacitor Ceramic 10pF/50V 10% 0603"
C502: library part "Cap Tantal 2312 (6032-28)", "Cap Tantal 10uF/6.3V 10% 1206"
C503: library part DCK-3R3E224U-E
C600 C602: library part "Cap Tantal 2917 (7343-31)", "Capacitor Alum 10uF/50V SMD 5x5.4mm"
C601: library part "Cap Cer 0805 (2012)", "CAP CER 0.1UF 50V X5R 0402"
C700: library part CC0402FRNPO9BN101, "CAP CER 100PF 50V C0G/NPO 0402"
C701 C706: library part CC0603KPX7R9BB104, "CAP CER 0.1UF 50V X5R 0402"
C703: library part C0603C104K5RACTU, "T? Ceramic 104/50V 10% 0603"
C707 C708 C709: library part CC0402GRNPO9BN200, "CAP CER 20PF 50V C0G/NPO 0402"
C802: library part Cap, "CAP Ceramic 106/50V 10% 1206"
D200 D800 D900 D901 D902 D903 D904 D905 D906: library part "Diode B340A", "Diode Schottky 3A/40V DO-214AB"
D400: library part "LED 3mm", "LED RED SMD 0402"
D500: library part "Diode F03", "1N4148 T4 SOD-123/1206 1N4148W"
D600: library part "Diode B340A", "Diode Schottky 5A/40V DO-214AB"
F200: library part RKEF110, "PTC RESET FUSE 33V 1A SMD 1812"
H700: library part MUP-C7801, "Nano Sim card Socket"
IC: "XL6019E1 IC Boost 5A TO-263-5"
IC200: library part MK9019, "100V Input, Ultra-Low IQ, Synchronous Buck Converter"
L200: library part Inductor, "Inductor SMD 3.3uH CD43-3R3 3.5*3*2.1mm"
L201: library part "Inductor Iron", "Inductor 10uH 7x7x4mm"
L202 L203: library part CBC2012T470M, "Inductor Ferrites 4A SMD 0603"
L501: library part FBMJ1608HM230NT, "Inductor Ferrites 4A SMD 0603"
L502: library part CBC2012T470M, "47nH"
L601: library part CBC2012T470M, "INDUCTOR 33uH SMD CDRH127-330"
L700 L701: library part CBC2012T470M, "INDUCTOR 200nH 20% 0805 SMD"
MD500: library part LC76G, "Compact GNSS Module"
P100: library part "Header 4X2", "Header, 4-Pin, Dual row"
P300: library part "Header 3", "Diode Infrared Receiver 38Khz"
P600 P601 P602 P800: library part "Header 2", "Header, 2-Pin"
P700: library part USB-M
Q700: library part 2N3906, "Mosfet P Channel"
Q701: library part 2N3904, "Trans C1815 NPN 0.15A/50V SMD SOT23"
R100 R102 R404 R604 R706 R710: library part Res1, "RES 1K OHM 1% 1/8W 0402"
R200: library part Res1, "RES 68K OHM 5% 1/8W 0402"
R201 R204: library part Res1, "RES 20K OHM 1% 1/8W 0402"
R202: library part Res1, "RES 20K OHM 5% 1/8W 0402"
R203 R600: library part Res1, "RES 5.1K OHM 5% 1/8W 0402"
R300 R601 R602 R605 R608 R705 R707 R801 R803 R804 R806 R901 R902 R905: library part Res1, "RES 10K OHM 5% 1/8W 0402"
R400 R401 R405 R607 R800 R802 R900: library part Res1, "Resistor 100K 1/8W 1% 0402"
R402: library part Res1, "Resistor"
R403: library part Res1, "RES 0 OHM 1/8W 0402"
R500 R501: library part RC0402FR-071KL, "RES 1K OHM 1% 1/8W 0402"
R503: library part RC0402JR-0710KL, "RES 10K OHM 5% 1/8W 0402"
R603: library part "Res 1W", "Res 1W 0.1R 1% SMD 2512"
R606: library part Res1, "RES 330 OHM 1% 1/8W 0402"
R620: library part Res1, "RES 100K OHM 5% 1/8W 0402"
R700: library part RT0603BRD071KL
R701 R702 R703 R704 R717 R718 R719 R720 R721 R722: library part RC0402JR-072K2L, "RES 2.2K OHM 1/8W 0402"
R708: library part Res1, "Tr? 1K 1/8W 1% 0603"
R709 R711: library part Res1, "RES 4.7K 1% 1/8W 0402"
R712 R713 R714 R715: library part RC0402FR-070RL, "RES 0 OHM JUMPER 1/16W 0402"
R716: library part RC0402JR-074K7P, "RES SMD 4.7K OHM 5% 1/16W 0402"
R777: library part Res1, "Tr? 10K 1/8W 1% 0603"
R805: library part Res1, "Resistor 1K 1/8W 1% 0603"
RV600: library part Res_Vol_Single, "Volume Varistor Single 200K"
RV900: library part Res_Vol_Single, "Volume Varistor Single 100K"
T500: library part A03415, "Mosfet P Channel"
T600 T800: library part AOD4185, "MOSFET P-CH 60V 26A TO252"
T601 T700 T701: library part 2SC1815-HF, "Trans C1815 NPN 0.15A/50V SMD SOT23"
T801: library part 2SC1815-HF, "Transistor  50V 150mA  NPN SMD SOT-23"
U202: "800mA and 1A Low Dropout Positive Regulator 3.3V"
U400: "STM32L ARM-based EnergyLite 32-bit MCU, 128 kB Flash, 16 kB Internal RAM, -40 to +85°C Temperature, 32-pin LQFP, Tray"
U601: library part INA138, "IC Current Monitor Regulator 0.5% SOT-23-5"
U700: library part TC7MPB9307FK, "IC Logic Convert 1.8V 3.3V 20-VSSOP"
U701: library part SMF05C, "TVS Diode Array For ESD and Latch-Up Protection"
U900: library part OPTOISO1, "Optoisolator Transistor Output 3750Vrms 1 Channel 4-SOP"
Y400: library part XTAL, "Crystal 8Mhz 20pF SMD 5032"
Y401: library part ABS25-32768-6-T, "CRYSTAL 32.768KHZ 6PF SMD"

## Free pads (board coordinates)
  round 11 hole 4.2: 0(55,55)
  round 0 hole 5: 0(80.404,99.443)

## Via types
v1: diameter 0.5, hole 0.3, Top Layer to Bottom Layer, tented both sides, 1270 vias
v2: diameter 0.6, hole 0.3, Top Layer to Bottom Layer, tented both sides, 48 vias
v3: diameter 1, hole 0.6, Top Layer to Bottom Layer, tented both sides, 37 vias

## Nets (pads, with @x,y where several pads share a name; then routed paths per layer and width w, separated by ;. In a path a pad name is that pad's centre, name@x,y a point inside that pad or via, vN(x,y) a via of type N, cw(c..) or ccw(c..) an arc to the next point about the centre after c; other vN are vias at no path point)
1.8V: 700.15 C704.2 R701.2 R702.2 R716.2 R717.2 R718.2 R719.2 U700.1 | length 64.7
  Top Layer w0.5: R718.2@46.154,81.693 R717.2@47.154,81.693 R719.2@48.154,81.693 R701.2@49.154,81.693 R702.2@50.154,81.693 ; R702.2@50.204,81.643 R702.2@50.154,81.693 ; C704.2@51.654,78.443 51.654,80.693 50.654,81.693 R702.2@50.154,81.693 ; 700.15@61.423,94.462 700.15@61.404,94.443 61.404,78.143 v1(61.929,77.618) ; R716.2@69.154,56.943 69.154,59.443 v1(74.654,64.943)
  Bottom Layer w0.5: v1(51.654,79.643) 59.929,79.643 v1@61.941,77.63 ; v1(61.929,77.618) 61.979,77.618 v1(74.654,64.943)
3.3V: `.1 C208.2 C209.1 C402.2 C405.2 C406.2 C407.2 C705.2 D500.1 L203.2 L502.1 R300.2 R401.2 R403.1 R404.1 R703.2 R704.2 R720.2 R721.2 R722.2 U202.2 U400.9 U400.24 U400.36 U400.48 U700.20 U900.4 | length 253
  Top Layer w0.254: U400.9@67.804,38.918 69.679,38.918 70.104,39.343 70.104,40.443
  Top Layer w0.5: U900.4@21.65,34.161 23.143,34.161 23.436,33.868 v1(23.436,32.225) ; v3(32.154,10.293) D500.1@33.904,10.293 ; v1(44.804,68.943) R722.2@45.654,68.943 R721.2@46.654,68.943 R720.2@47.654,68.943 R704.2@48.654,68.943 50.904,68.943 51.654,69.693 51.654,70.393 ; 70.104,40.443 70.104,41.243 69.904,41.443 69.904,42.65 70.197,42.943 C402.2@70.904,42.943 R401.2@72.154,42.943 v3(72.154,43.993) ; C407.2@70.404,31.693 v1(70.404,32.943) ; R403.1@71.654,30.693 71.654,30.093 v1(72.104,29.643)
  Top Layer w0.6: L203.2@27.404,31.47 27.404,30.443 v1(27.904,29.943) 41.404,29.943 ; `.1@31.154,38.443 R300.2@31.154,41.443 ; 51.654,70.393 C705.2@51.654,72.443 ; R404.1@54.404,42.443 58.904,42.443
  Top Layer w0.9: L502.1@23.879,20.943 v3(23.879,22.693)
  Top Layer w1: U202.2@34.606,33.693 37.404,33.693 U202.2@40.702,33.693 ; v3(52.904,33.443) 52.904,31.718 55.804,28.818 64.529,28.818 v3(66.554,30.843)
  Bottom Layer w0.5: v1(27.904,29.943) 24.154,29.943 23.436,30.661 v1(23.436,32.225) 23.436,37.475 25.404,39.443 25.404,43.443 25.904,43.943 26.904,43.943 ; v1(31.104,39.943) 31.104,43.543 30.704,43.943 26.904,43.943 ; v1(44.804,68.943) 44.804,62.093 43.654,60.943 27.904,60.943 26.904,59.943 26.904,43.943 ; v1(70.404,32.943) 70.404,31.343 v1(72.104,29.643)
  Bottom Layer w0.6: v3@58.904,44.342 v3(58.904,44.393)
  Bottom Layer w1: v3(23.879,22.693) 23.879,13.068 26.654,10.293 v3(32.154,10.293) 33.054,10.293 34.204,11.443 34.204,17.357 34.79,17.943 43.404,17.943 v3(55.054,29.593) ; v3(41.154,25.193) 41.154,29.193 45.404,33.443 v3(52.904,33.443) v1(55.654,33.443) v1(56.904,33.443) 58.404,34.943 58.404,43.893 v3(58.904,44.393) ; v3(66.554,30.843) 66.554,32.093 67.404,32.943 v1(70.404,32.943) 72.604,35.143 72.604,43.543 v3(72.154,43.993)
GND: BT400.2 C201.1 C202.1 C203.2 C204.2 C205.1 C208.1 C209.2 C400.1 C401.1 C402.1 C403.1 C404.1 C405.1 C406.1 C407.1 C500.1 C501.1 C502.2 C503.2 C600.2 C601.1 C602.2 C603.1 C801.1 C802.2 C803.1 C900.1 D200.1 IC200.1 IC200.EPAD IC.1 L701.1 MD500.1 MD500.10 MD500.12 MD500.28 P100.5 P100.8 P300.2 P600.2 P601.1 P602.2 P800.2 R201.1 R203.1 R204.1 R205.1 R400.1 R405.1 R605.1 R607.1 R620.1 R803.1 R804.1 R806.1 R901.1 R902.1 T601.2 T801.2 T905.1 U202.1 U400.8 U400.23 U400.35 U400.47 U601.2 U900.2 | length 78
  Top Layer w0.254: U400.35@59.104,35.418 61.554,35.418 ; U400.47@65.704,33.318 65.704,34.843 ; 65.804,38.418 U400.8@67.804,38.418 70.929,38.418
  Top Layer w0.5: v1(3.904,70.793) C603.1@4.904,70.793 ; R607.1@7.404,71.793 v1(7.404,72.943) ; C601.1@19.654,81.943 R620.1@19.654,83.093 ; C900.1@27.654,26.943 C801.1@30.654,26.943 ; R205.1@37.654,59.193 R203.1@37.654,58.193 v1(38.904,58.193) v1(40.154,58.193) v1(41.404,58.193) v1(42.904,58.193) v1(44.154,58.193) 44.654,58.193 45.654,57.193 R204.1@45.654,55.193 ; C205.1@45.654,51.193 45.904,51.443 R201.1@45.904,52.693 ; v1(68.254,30.693) R400.1@69.154,30.693 C407.1@70.404,30.693 ; C403.1@74.154,30.693 v1(75.404,29.443) ; C404.1@74.154,35.943 C401.1@74.154,39.443 ; C400.1@74.154,42.943 v1(74.154,45.15) 74.247,45.243 79.361,45.243 79.654,44.95 v1@79.654,44.443 ; v1(79.654,36.918) 79.654,37.443
  Top Layer w0.6: R804.1@3.654,65.693 C803.1@3.654,66.943 v1(3.654,68.193) ; v1(58.904,45.943) R405.1@60.404,45.943
  Top Layer w1: v1(75.404,29.443) v1(77.154,29.443) v1(78.654,29.443) v1(80.404,29.443) v1(82.154,29.443) 84.654,29.443 v1(84.654,33.443) v1(84.654,34.693) v1(84.654,36.193) 84.654,37.443 v1(83.904,37.443) v1(82.404,37.443) v1(80.904,37.443) 79.654,37.443 v1(79.654,37.943) v1(79.654,39.443) v1(79.654,40.943) v1(79.654,42.443) v1(79.654,43.693) v1@79.654,44.443
  other v1: 42.404,2.443 44.404,2.443 46.404,2.443 48.404,2.443 50.404,2.443 52.404,2.443 54.404,2.443 56.404,2.443 58.404,2.443 60.404,2.443 62.404,2.443 64.404,2.443 66.404,2.443 68.404,2.443 35.404,4.443 37.404,4.443 39.404,4.443 41.404,4.443 43.404,4.443 45.404,4.443 47.404,4.443 49.404,4.443 51.404,4.443 53.404,4.443 55.404,4.443 57.404,4.443 59.404,4.443 61.404,4.443 63.404,4.443 65.404,4.443 67.404,4.443 69.404,4.443 71.404,4.443 73.404,4.443 32.404,6.443 36.404,6.443 38.404,6.443 40.404,6.443 42.404,6.443 44.404,6.443 46.404,6.443 48.404,6.443 50.404,6.443 52.404,6.443 54.404,6.443 56.404,6.443 58.404,6.443 60.404,6.443 62.404,6.443 64.404,6.443 66.404,6.443 68.404,6.443 70.404,6.443 72.404,6.443 74.404,6.443 76.404,6.443 27.404,8.443 29.404,8.443 31.404,8.443 43.404,8.443 45.404,8.443 47.404,8.443 49.404,8.443 51.404,8.443 53.404,8.443 55.404,8.443 57.404,8.443 59.404,8.443 61.404,8.443 63.404,8.443 65.404,8.443 67.404,8.443 69.404,8.443 71.404,8.443 73.404,8.443 81.404,8.443 41.654,8.693 25.904,9.193 27.154,9.193 28.154,9.193 29.154,9.193 30.404,9.193 31.654,9.193 42.654,9.193 25.154,9.943 41.654,9.943 43.404,9.943 24.404,10.443 42.654,10.443 44.404,10.443 46.404,10.443 48.404,10.443 50.404,10.443 52.404,10.443 54.404,10.443 56.404,10.443 58.404,10.443 60.404,10.443 62.404,10.443 64.404,10.443 66.404,10.443 68.404,10.443 70.404,10.443 74.404,10.443 80.404,10.443 82.404,10.443 84.404,10.443 23.704,10.943 41.654,10.943 23.154,11.443 27.404,11.443 28.404,11.443 42.404,11.443 43.404,11.443 39.904,11.943 41.154,11.943 38.504,12.043 22.304,12.143 28.154,12.193 88.404,12.193 21.404,12.443 27.404,12.443 39.404,12.443 57.404,12.443 59.404,12.443 61.404,12.443 63.404,12.443 65.404,12.443 67.404,12.443 69.404,12.443 71.404,12.443 73.404,12.443 75.404,12.443 77.404,12.443 79.404,12.443 81.404,12.443 83.404,12.443 85.404,12.443 87.404,12.443 30.154,12.693 21.404,13.143 29.904,13.443 39.654,13.443 88.404,13.693 87.654,14.193 36.404,14.443 38.404,14.443 58.404,14.443 60.404,14.443 62.404,14.443 64.404,14.443 66.404,14.443 68.404,14.443 70.404,14.443 74.404,14.443 76.404,14.443 78.404,14.443 80.404,14.443 82.404,14.443 84.404,14.443 86.404,14.443 88.404,14.943 39.654,15.443 87.654,15.443 17.404,16.443 35.404,16.443 37.404,16.443 39.404,16.443 53.404,16.443 57.404,16.443 59.404,16.443 61.404,16.443 63.404,16.443 65.404,16.443 67.404,16.443 69.404,16.443 71.404,16.443 73.404,16.443 75.404,16.443 77.404,16.443 79.404,16.443 81.404,16.443 83.404,16.443 85.404,16.443 87.404,16.443 88.404,16.443 87.654,17.443 88.404,17.693 18.404,18.443 46.404,18.443 48.404,18.443 50.404,18.443 52.404,18.443 54.404,18.443 56.404,18.443 58.404,18.443 60.404,18.443 62.404,18.443 64.404,18.443 66.404,18.443 68.404,18.443 70.404,18.443 74.404,18.443 76.404,18.443 82.404,18.443 84.404,18.443 86.404,18.443 87.654,18.443 88.404,18.943 87.654,19.693 88.404,20.193 13.404,20.443 19.404,20.443 47.404,20.443 49.404,20.443 51.404,20.443 53.404,20.443 55.404,20.443 57.404,20.443 59.404,20.443 61.404,20.443 63.404,20.443 65.404,20.443 67.404,20.443 69.404,20.443 83.404,20.443 85.404,20.443 87.404,20.443 87.654,21.443 88.404,21.693 12.404,22.443 14.404,22.443 18.404,22.443 20.404,22.443 22.404,22.443 50.404,22.443 52.404,22.443 54.404,22.443 56.404,22.443 58.404,22.443 60.404,22.443 62.404,22.443 64.404,22.443 66.404,22.443 68.404,22.443 70.404,22.443 82.404,22.443 84.404,22.443 86.404,22.443 87.654,22.693 88.404,22.943 87.654,23.443 88.404,24.193 23.404,24.443 25.404,24.443 27.404,24.443 51.404,24.443 53.404,24.443 55.404,24.443 57.404,24.443 59.404,24.443 61.404,24.443 63.404,24.443 65.404,24.443 67.404,24.443 69.404,24.443 83.404,24.443 85.404,24.443 87.404,24.443 32.154,24.943 33.404,25.193 34.404,25.193 35.404,25.193 36.404,25.193 37.404,25.193 87.654,25.443 88.404,25.443 33.154,26.193 37.904,26.193 54.404,26.443 56.404,26.443 58.404,26.443 60.404,26.443 62.404,26.443 64.404,26.443 66.404,26.443 68.404,26.443 76.404,26.443 82.404,26.443 84.404,26.443 86.404,26.443 37.154,26.693 88.404,26.693 32.904,27.193 37.904,27.443 27.654,27.943 28.654,27.943 29.654,27.943 30.654,27.943 32.904,28.193 37.154,28.193 19.404,28.443 21.404,28.443 25.404,28.443 75.404,28.443 76.404,28.443 77.404,28.443 78.654,28.443 79.404,28.443 80.404,28.443 81.404,28.443 82.404,28.443 83.404,28.443 84.404,28.443 37.904,28.693 32.904,28.943 76.279,29.443 77.904,29.443 79.529,29.443 81.279,29.443 83.104,29.443 84.204,29.443 75.654,29.943 76.904,29.943 78.154,29.943 79.154,29.943 80.654,29.943 81.654,29.943 82.654,29.943 74.779,30.068 20.654,30.193 21.654,30.193 83.654,30.193 84.704,30.343 22.404,30.443 83.654,31.443 84.654,31.443 17.404,32.443 83.654,32.443 85.404,32.443 87.404,32.443 84.604,32.643 88.404,33.193 83.654,33.693 84.654,34.068 67.404,34.193 68.404,34.193 69.404,34.193 73.404,34.243 10.404,34.443 83.654,34.693 88.404,34.943 26.904,35.443 28.154,35.443 29.404,35.443 37.154,35.443 84.654,35.443 30.654,35.693 31.654,35.693 32.654,35.693 83.654,35.693 36.404,35.943 52.154,35.943 53.154,35.943 54.404,35.943 57.154,35.943 26.154,36.193 37.654,36.193 71.504,36.243 79.254,36.418 30.654,36.443 31.654,36.443 39.404,36.443 75.404,36.443 76.154,36.443 76.904,36.443 77.654,36.443 78.404,36.443 80.404,36.443 81.404,36.443 82.404,36.443 83.404,36.443 85.404,36.443 87.404,36.443 88.404,36.443 32.654,36.693 36.904,36.693 74.104,36.743 76.404,36.943 77.904,36.943 78.779,37.018 75.329,37.068 38.154,37.193 26.404,37.443 32.154,37.443 33.154,37.443 33.904,37.443 35.154,37.443 61.554,37.443 36.154,37.693 74.154,37.693 60.404,37.743 61.104,37.843 88.404,37.943 78.904,38.193 4.404,38.443 6.404,38.443 8.404,38.443 10.404,38.443 32.154,38.443 33.154,38.443 34.154,38.443 35.154,38.443 36.404,38.443 38.404,38.443 46.404,38.443 60.404,38.443 80.404,38.443 82.404,38.443 84.404,38.443 86.404,38.443 61.104,38.543 74.204,38.543 70.904,38.693 79.654,38.693 61.504,38.943 60.504,39.043 71.454,39.043 78.904,39.193 88.404,39.193 61.104,39.443 70.904,39.443 60.604,39.743 71.504,39.843 78.904,39.943 70.904,40.193 79.654,40.193 32.904,40.443 33.904,40.443 39.404,40.443 47.404,40.443 49.404,40.443 60.654,40.443 81.404,40.443 83.404,40.443 85.404,40.443 88.404,40.443 71.504,40.593 70.904,40.943 78.904,40.943 57.154,41.193 68.529,41.343 56.654,41.443 59.654,41.443 32.904,41.693 33.904,41.693 78.904,41.693 79.654,41.693 88.404,41.693 68.029,41.893 2.404,42.443 24.404,42.443 38.404,42.443 48.404,42.443 50.404,42.443 68.404,42.443 80.404,42.443 82.404,42.443 84.404,42.443 78.904,42.693 67.954,42.993 61.404,43.443 68.404,43.443 62.004,43.493 78.904,43.693 67.929,43.893 74.154,44.047 61.904,44.193 68.404,44.393 7.404,44.443 47.404,44.443 49.404,44.443 51.404,44.443 53.404,44.443 55.404,44.443 57.404,44.443 69.404,44.443 73.404,44.443 79.404,44.443 81.404,44.443 83.404,44.443 67.929,44.818 79.154,45.193 75.904,45.443 77.154,45.443 57.904,45.943 24.154,46.193 25.654,46.193 6.404,46.443 48.404,46.443 50.404,46.443 52.404,46.443 54.404,46.443 56.404,46.443 68.404,46.443 70.404,46.443 72.404,46.443 74.404,46.443 76.404,46.443 78.404,46.443 80.404,46.443 82.404,46.443 84.404,46.443 57.904,46.693 58.904,46.693 60.404,46.943 61.404,46.943 62.404,46.943 10.404,47.943 11.404,47.943 24.154,47.943 25.404,47.943 8.154,48.193 9.154,48.193 3.404,48.443 5.404,48.443 7.404,48.443 23.404,48.443 29.404,48.443 47.404,48.443 49.404,48.443 8.154,49.193 9.154,49.193 24.154,49.693 25.404,49.693 8.154,50.193 9.154,50.193 2.404,50.443 4.404,50.443 6.404,50.443 24.404,50.443 39.404,50.693 40.654,50.693 42.154,50.693 43.404,50.693 10.154,50.943 11.154,50.943 12.154,50.943 8.154,51.193 9.154,51.193 24.154,51.193 25.404,51.193 8.154,52.193 9.154,52.193 23.404,52.443 38.654,52.443 40.154,52.443 24.154,52.943 25.404,52.943 39.404,53.443 24.404,54.443 38.654,54.443 40.154,54.443 38.404,62.443 40.404,62.443 42.404,62.443 39.404,64.443 45.904,64.943 48.154,65.193 48.904,65.193 45.904,65.693 48.154,65.943 48.904,65.943 2.404,66.443 45.904,66.443 43.904,66.693 48.154,66.693 48.904,66.693 49.654,66.693 7.654,67.193 8.654,67.193 9.654,67.193 45.904,67.193 48.154,67.443 48.904,67.443 49.654,67.443 43.904,67.693 11.154,67.943 45.904,67.943 7.654,68.043 8.654,68.043 9.654,68.043 23.404,68.443 25.404,68.443 29.404,68.443 33.404,68.443 35.404,68.443 37.404,68.443 39.404,68.443 41.404,68.443 43.904,68.443 7.654,68.943 8.654,68.943 9.654,68.943 11.154,68.943 43.904,69.443 20.404,70.443 24.404,70.443 28.404,70.443 34.404,70.443 36.404,70.443 38.404,70.443 40.404,70.443 42.404,70.443 43.904,70.443 43.904,71.193 25.404,72.443 29.404,72.443 33.404,72.443 35.404,72.443 37.404,72.443 39.404,72.443 41.404,72.443 4.404,74.443 6.404,74.443 20.404,74.443 24.404,74.443 28.404,74.443 30.404,74.443 34.404,74.443 36.404,74.443 38.404,74.443 40.404,74.443 5.404,76.443 7.404,76.443 11.404,76.443 13.404,76.443 31.404,76.443 33.404,76.443 35.404,76.443 37.404,76.443 39.404,76.443 6.404,78.443 20.404,78.443 8.204,78.743 9.454,78.743 10.704,78.743 11.904,78.743 8.204,79.743 9.454,79.743 10.704,79.743 11.954,79.743 7.404,80.443 13.404,80.443 8.204,80.743 9.454,80.743 10.704,80.743 11.954,80.743 8.204,81.743 9.454,81.743 10.704,81.743 11.954,81.743 8.404,82.443 10.404,82.443 12.404,82.443 16.404,82.443 18.404,82.443 20.404,82.443 9.404,84.443 11.404,84.443 13.404,84.443 17.404,84.443 27.404,84.443 12.404,86.443 17.404,86.443 18.654,86.443 19.904,86.443 21.104,86.443 26.404,86.443 28.404,86.443 17.404,87.443 18.654,87.443 19.904,87.443 21.154,87.443 13.404,88.443 17.404,88.443 18.654,88.443 19.904,88.443 21.154,88.443 23.404,88.443 25.404,88.443 27.404,88.443 17.404,89.443 18.654,89.443 19.904,89.443 21.154,89.443 37.404,92.443 39.404,92.443 37.404,96.443 46.729,97.593 45.679,98.343 36.404,98.443 42.404,98.443 46.729,98.468 25.404,100.443 27.404,100.443 29.404,100.443 31.404,100.443 33.404,100.443 35.404,100.443 37.404,100.443 41.404,100.443 30.404,102.443 32.404,102.443 34.404,102.443 36.404,102.443 38.404,102.443 40.404,102.443 42.404,102.443 38.154,103.443 41.154,103.443 38.154,104.193 41.154,104.193 33.404,104.443 35.404,104.443 37.404,104.443 43.404,104.443 45.404,104.443 47.404,104.443 49.404,104.443 51.404,104.443 38.154,104.943 41.154,104.943 38.154,105.693 41.154,105.693 38.404,106.443 39.154,106.443 39.904,106.443 40.654,106.443 42.404,106.443 44.404,106.443 46.404,106.443 48.404,106.443 45.404,108.443 47.404,108.443 49.404,108.443
  other v2: 55,11.647 52.38,11.859 43.149,12.209 44.749,12.209 46.349,12.209 47.949,12.209 49.549,12.209 53.582,12.304 51.044,12.647 54.244,12.657 43.949,12.833 45.549,12.833 47.149,12.833 48.749,12.833 55.395,12.876 52.701,13.079 43.149,13.47 44.749,13.47 46.349,13.47 47.949,13.47 49.549,13.47 51.149,13.47 56.787,13.597 55.526,13.615 56.056,14.659 55.549,15.215 43.482,15.416 45.082,15.416 46.682,15.416 48.282,15.416 49.882,15.416 51.482,15.416 43.968,15.788 45.882,16.053 47.482,16.053 49.082,16.053 56.341,16.196 54.304,16.221 50.544,16.249 55.128,16.28 52.005,16.444 43.482,16.677 45.082,16.677 46.682,16.677 48.282,16.677 49.882,16.677 51.92,17.056 53.958,17.434
GPS_PWR: L501.1 L502.2 R503.2 T500.2 | length 3.2
  Top Layer w0.254: T500.2@21.404,17.243 21.354,17.293 21.354,19.294 21.503,19.443 R503.2@22.404,19.443
GPS_VCC: C500.2 C501.2 C502.1 L501.2 MD500.8 T500.3 | length 3.1
  Top Layer w0.5: L501.2@19.304,15.043 T500.3@22.404,15.043
GSM.DTR: 700.3 R719.1 U700.4 | length 47.6
  Top Layer w0.254: U700.4@48.129,78.393 48.141,78.405 48.141,80.681 R719.1@48.154,80.693 ; v1(73.404,92.918) 700.3@73.404,94.443
  Bottom Layer w0.254: v1(48.154,80.043) 45.479,82.718 45.479,92.843 47.179,94.543 67.004,94.543 69.329,92.218 72.704,92.218 v1(73.404,92.918)